# Altium PCB PMP41115.PcbDoc (part 5 of 6)
Units mm, origin at the board's own origin, x right, y up, seen from the top; angles counter-clockwise.
Board outline 102.92 x 46.74 mm, 4 copper layers (Top Layer, Signal Layer 1, Signal Layer 2, Bottom Layer), stack 1.016 mm thick; 174 components, 114 nets, 547 pads, 2622 vias.
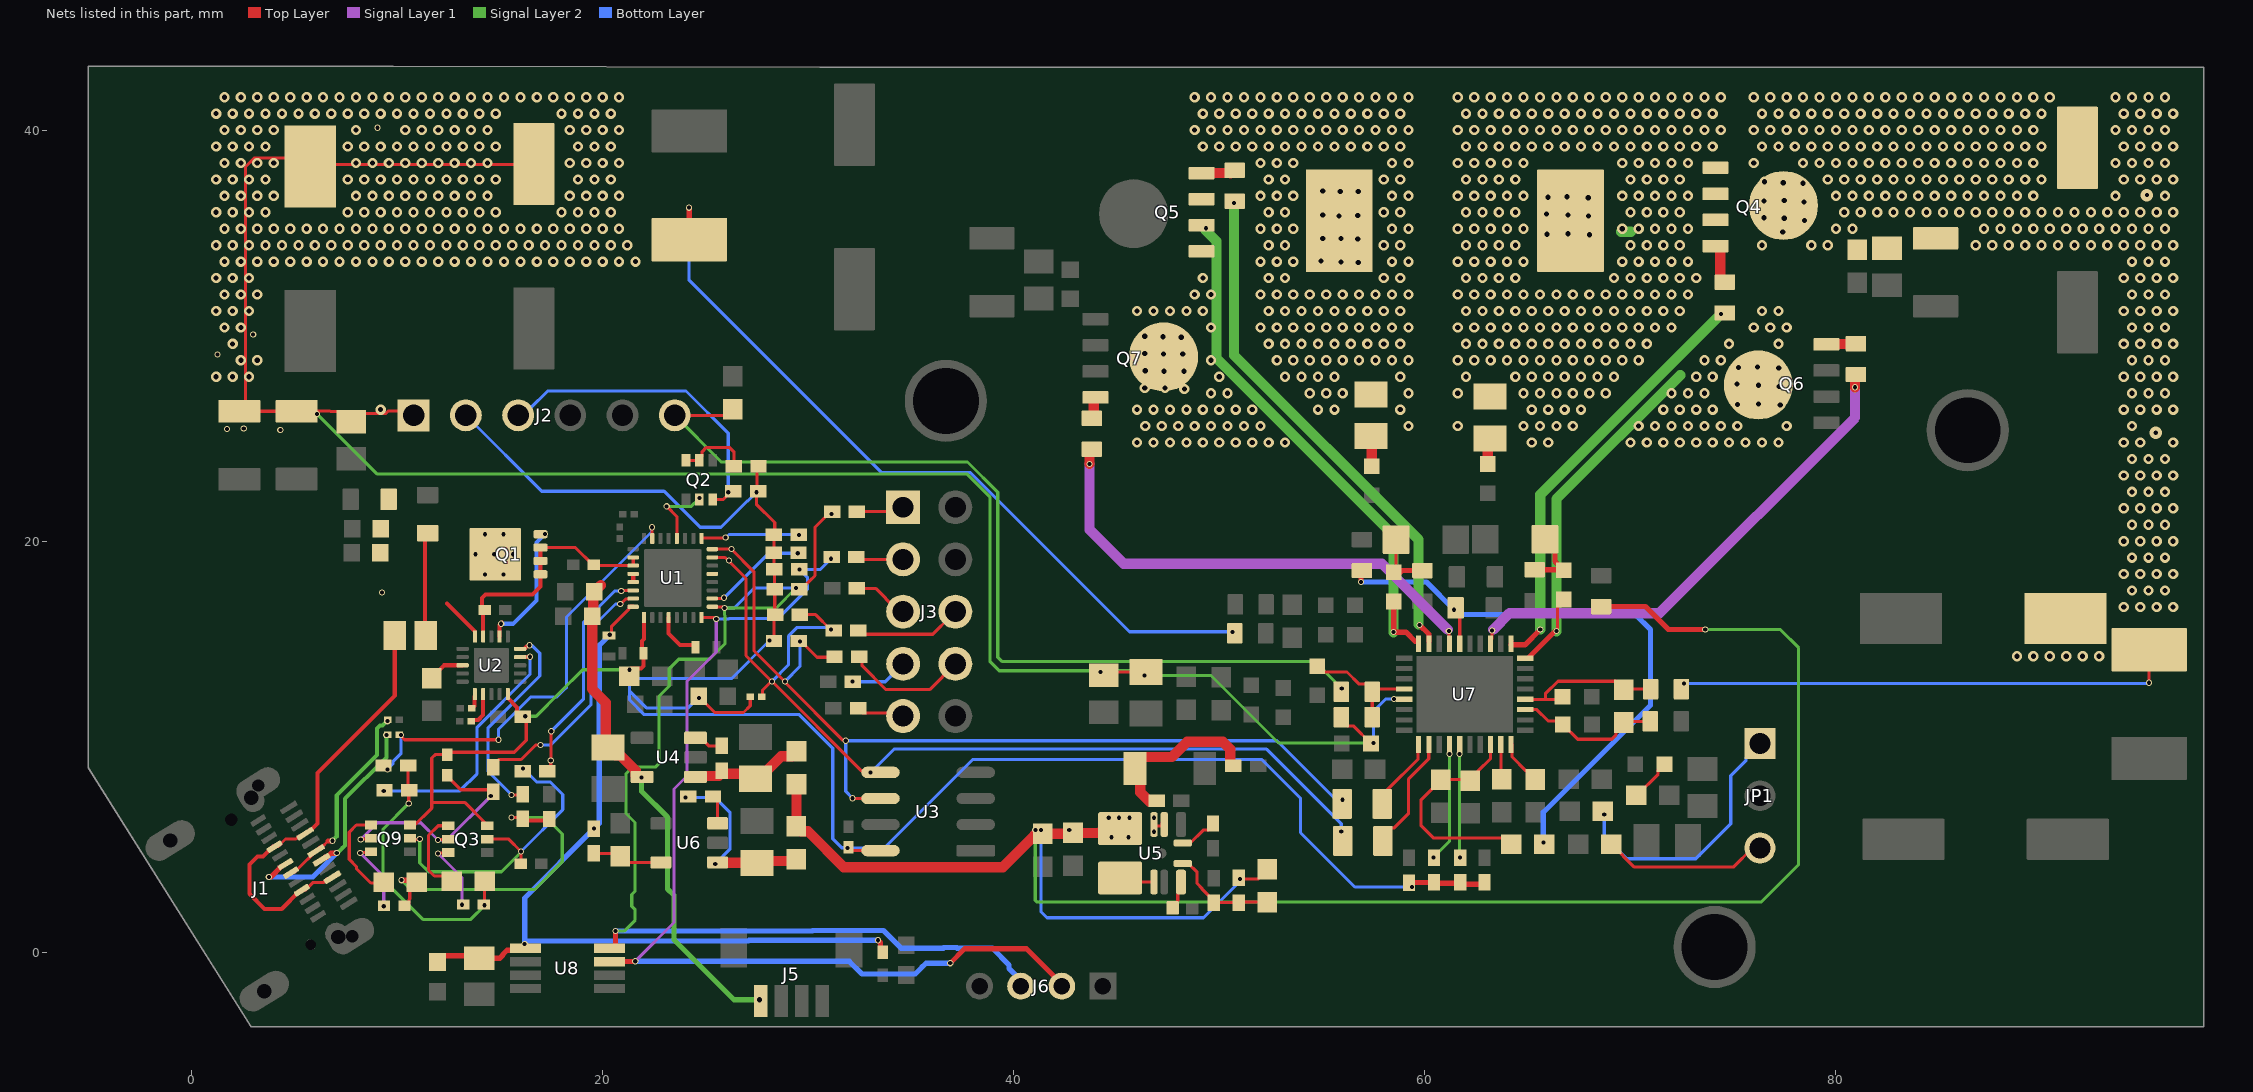
[diagram p5: the nets of this part, all layers, seen from the top]

## Via types
v1: diameter 0.5, hole 0.25, Top Layer to Bottom Layer, 2320 vias
v2: diameter 0.3, hole 0.2, Top Layer to Bottom Layer, tented both sides, 198 vias
v3: diameter 0.5, hole 0.25, Top Layer to Bottom Layer, tented both sides, 61 vias
v4: diameter 0.5, hole 0.2, Top Layer to Bottom Layer, tented both sides, 19 vias
v5: diameter 0.61, hole 0.203, Top Layer to Bottom Layer, tented both sides, 13 vias
v6: diameter 0.5, hole 0.2, Top Layer to Bottom Layer, 6 vias
v7: diameter 0.4, hole 0.2, Top Layer to Bottom Layer, tented both sides, 3 vias
v8: diameter 0.35, hole 0.2, Top Layer to Bottom Layer, tented both sides, 2 vias

## Nets (pads, with @x,y where several pads share a name; then routed paths per layer and width w, separated by ;. In a path a pad name is that pad's centre, name@x,y a point inside that pad or via, vN(x,y) a via of type N, cw(c..) or ccw(c..) an arc to the next point about the centre after c; other vN are vias at no path point) (continued)
GPIO5: R19.1 R100.2 U1.23 | length 21.5
  Top Layer w0.152: v2(10.211,10.592) 10.211,10.534 10.228,10.517 10.382,10.363 v2(14.961,10.363) ; v2(22.428,20.702) 22.432,20.698 22.432,20.16 U1.23@22.435,20.157
  Bottom Layer w0.152: v2(9.551,8.915) 9.821,9.185 9.821,9.288 10.211,9.677 v2(10.211,10.592) ; v2(14.961,10.363) 14.961,10.871 16.535,12.446 17.805,12.446 18.237,12.878 ; 18.263,12.878 18.263,16.332 22.4,20.47 22.4,20.673 v2(22.428,20.702)
GPIO6: R98.1 U1.31 | length 12.3
  Top Layer w0.152: R98.1@14.695,9.029 14.695,9.129 14.968,9.402 16.056,9.402 16.763,10.108 v2(16.993,10.109) v2(16.993,10.109) ; v2(20.879,16.967) 20.909,16.967 21.15,17.208 21.311,17.208 U1.31@21.336,17.232
  Bottom Layer w0.152: v2(16.993,10.109) 17.501,10.109 19.456,12.065 19.456,15.773 20.649,16.966 v2(20.879,16.967) v2(20.879,16.967)
GPIO7: R107.1 U1.30 | length 10.9
  Top Layer w0.152: R107.1@17.332,8.825 17.501,8.994 v2(17.501,9.347) 17.512,9.358 17.512,10.762 v2(17.523,10.773) ; v2(20.93,17.602) 20.944,17.617 21.351,17.617 U1.30@21.361,17.628
  Bottom Layer w0.152: v2(17.523,10.773) 19.101,12.351 19.101,16.078 20.625,17.602 v2(20.93,17.602)
GPIO11: U1.13
GPIO_NF: Q3.5 Q9.5 R107.2 R108.2 | length 15.7
  Top Layer w0.15: Q9.5@10.653,5.563 10.704,5.512 v2@11.049,5.512
  Top Layer w0.152: Q3.5@14.478,5.563 14.513,5.527 15.453,5.527 v2(16.053,4.928) 16.053,4.343 R108.2@16.027,4.318
  Signal Layer 2 w0.152: v2(11.125,5.537) 11.125,4.369 11.557,3.937 15.102,3.937 16.025,4.859 v2@16.025,4.93
  Bottom Layer w0.152: v2@16.027,4.877 16.027,4.902 v2(16.053,4.928) 18.085,6.96 18.085,7.696 17.475,8.306 16.815,8.306 v2(16.154,8.966)
GPIO_PF: Q3.2 Q9.2 R97.1 R98.2 | length 11.6
  Top Layer w0.15: v2(8.255,5.512) 8.28,5.537 8.585,5.537 Q9.2@8.611,5.512 ; v2(12.014,5.486) 12.035,5.507 12.451,5.507 Q3.2@12.471,5.486
  Top Layer w0.152: R97.1@12.459,8.638 12.459,8.588 13.118,7.929 14.595,7.929 14.653,7.871 R98.2@14.695,7.829 14.58,7.714 v2(14.58,7.62)
  Signal Layer 1 w0.15: v2(8.255,5.512) 9.068,6.325 11.176,6.325 v2(12.014,5.486) 12.446,5.486 v2(14.58,7.62)
HIDRV1: R37.2 U7.27 | length 25.2
  Top Layer w0.152: v2(59.766,15.951) v2@59.774,15.951
  Top Layer w0.254: v2(59.766,15.951) 60.223,15.494 U7.27@60.223,15.138
  Signal Layer 2 w0.5: v2(50.739,36.466) 50.739,29.068 59.715,20.091 v2@59.715,15.977
HIDRV2: R34.2 U7.19 | length 21
  Top Layer w0.152: U7.19@64.218,15.136 U7.19@64.267,15.185
  Top Layer w0.254: U7.19@64.22,14.978 64.889,14.978 v2(65.634,15.723)
  Top Layer w0.5: v2(74.422,31.064) 74.481,31.123 R34.2@74.615,31.123
  Signal Layer 2 w0.5: v2(65.634,15.723) 65.634,22.276 v2(74.422,31.064)
I2Cc_SCL: R6.1 R64.2 R109.2 U1.16 U3.6 | length 46.7
  Top Layer w0.152: U1.16@25.36,19.632 25.361,19.633 26.288,19.633 v2(26.289,19.634) 27.381,18.542 27.381,14.707 v2@28.891,13.196 ; v2(28.895,13.2) 28.895,13.16 28.969,13.086 28.969,13.08 31.708,10.341 31.823,10.341 v2(31.852,10.312) ; R6.1@29.561,15.164 29.661,15.164 30.449,14.376 R109.2@31.013,14.376 ; v2(32.182,7.518) 32.188,7.512 32.874,7.512 U3.6@32.893,7.493 ; U3.6@32.87,7.687 33.051,7.506 U3.6@33.541,7.506 ; U3.6@33.985,7.518 U3.6@34.318,7.518
  Bottom Layer w0.152: v2@28.905,13.208 28.905,13.21 29.618,13.923 v2(29.618,15.142) ; v2@32.196,7.544 32.156,7.544 31.852,7.849 v2(31.852,10.312) 52.832,10.312 55.702,7.442 v2(56.007,7.442)
I2Cc_SDA: R7.1 R12.1 R60.2 R63.2 U1.15 U3.5 | length 47.5
  Top Layer w0.152: U1.15@25.476,19.228 25.984,19.228 27,18.212 27,14.453 v2@28.232,13.221 ; R12.1@27.768,12.458 27.793,12.483 27.793,12.757 28.232,13.196 v2@28.219,13.208 ; v2(28.26,13.2) 32.609,8.851 U3.5@33.06,8.851 ; R7.1@29.617,16.45 30.383,16.45 31.111,15.723 v2(31.14,15.723) ; v2(33.06,8.769) U3.5@33.06,8.851 ; U3.5@33.541,8.776 33.466,8.851 U3.5@33.06,8.851
  Bottom Layer w0.152: v2@28.245,13.208 28.268,13.208 29.058,13.998 29.058,15.392 29.491,15.826 30.997,15.826 31.1,15.723 v2(31.14,15.723) ; v2(33.06,8.769) 34.198,9.906 52.324,9.906 55.956,6.274 v2(55.956,5.893)
  other v2: 26.163,19.079
I2Ct_SCL: J6.3 R3.1 R18.1 U1.9 U8.8 | length 55.1
  Top Layer w0.152: U1.9@25.324,16.84 25.345,16.819 25.864,16.819 25.919,16.764 v2(25.959,16.764) ; R3.1@29.591,17.685 29.691,17.685 30.093,18.088 30.353,18.347 30.353,20.701 30.871,21.219 30.871,21.235 31.099,21.463 R18.1@31.115,21.463
  Top Layer w0.254: U8.8@20.358,0.213 20.549,0.213 20.65,0.315 v2(20.65,1.054)
  Signal Layer 2 w0.152: v2(20.65,1.054) 21.069,1.054 21.602,1.586 21.602,2.094 21.438,2.259 21.438,2.833 21.597,2.992 21.597,6.336 21.161,6.772 21.161,8.715 21.488,9.042 22.609,9.042 22.761,9.195 22.761,12.469 23.266,12.974 23.266,13.818 23.724,14.275 25.222,14.275 25.978,15.031 25.978,16.407 25.959,16.427 v2(25.959,16.764) 28.455,16.764 v2(29.432,17.741)
  Bottom Layer w0.152: v2(25.959,16.764) 26.416,16.764 27.393,17.741 v2(29.432,17.741)
  Bottom Layer w0.254: v2(20.65,1.054) 26.949,1.054 26.958,1.064 30.224,1.064 30.247,1.087 33.682,1.087 34.546,0.223 36.589,0.223 36.617,0.251 37.246,0.251 37.274,0.223 38.978,0.223 39.791,-0.591 39.791,-0.771 J6.3@40.437,-1.417
  other v2: 31.155,21.353
I2Ct_SDA: J6.2 R4.1 R20.1 U1.8 U8.7 | length 50.6
  Top Layer w0.152: U1.8@24.835,16.307 25.437,16.307 25.487,16.256 v2@25.552,16.256 ; v2@25.512,16.231 v2(25.552,16.231) ; R20.1@31.048,19.228 R20.1@31.166,19.228
  Top Layer w0.254: U8.7@20.358,-0.437 20.369,-0.426 21.584,-0.426 v2@21.59,-0.432 ; v2(36.932,-0.508) 37.632,0.193 40.64,0.193 42.316,-1.484 J6.2@42.316,-1.651
  Signal Layer 1 w0.152: v2(21.61,-0.415) 23.495,1.47 23.495,7.963 24.13,8.598 24.13,13.208 25.552,14.63 v2(25.552,16.231)
  Bottom Layer w0.152: v2(25.552,16.231) 26.153,16.231 26.175,16.253 28.546,16.253 29.997,17.704 29.997,18.242 v2@29.621,18.618 ; v2(29.592,18.647) 30.608,18.647 31.09,19.128 v2@31.09,19.177
  Bottom Layer w0.254: v2(21.61,-0.415) 32.016,-0.415 32.635,-1.035 35.229,-1.035 35.531,-0.732 35.531,-0.726 35.749,-0.508 v2(36.932,-0.508)
  other v2: 31.13,19.169
I\2\C\c\_\I\R\Q\: R8.1 U1.17 | length 4.8
  Top Layer w0.152: U1.17@24.841,20.218 24.841,20.192 24.859,20.175 25.991,20.175 v2(26.01,20.193)
  Bottom Layer w0.152: v2(26.01,20.193) 26.02,20.193 26.173,20.345 v2@29.549,20.345
  other v2: 29.567,20.323
I\2\C\t\_\I\R\Q\: R5.1 U1.10 | length 5.2
  Top Layer w0.152: U1.10@25.36,17.232 25.853,17.232 25.908,17.287 v2@25.908,17.297
  Bottom Layer w0.152: v2(25.933,17.272) 28.096,19.434 29.493,19.434 v2@29.54,19.482 ; v2(29.516,19.434) 29.544,19.434 v2@29.566,19.456
ICHG: R71.2 U7.9 | length 1.6
  Top Layer w0.152: U7.9@63.754,10.008 63.718,9.972 63.718,8.479 R71.2@63.767,8.43
ILIM_HIZ: R65.2 U7.10 | length 2.3
  Top Layer w0.152: U7.10@64.218,10.178 64.267,10.129 64.267,9.52 64.936,8.851 65.001,8.851 65.405,8.446 R65.2@65.405,8.382
LDO_1V5: C17.2 U1.4 | length 2.4
  Top Layer w0.2: U1.4@23.235,16.307 23.235,15.921 23.223,15.909 23.223,15.536 23.781,14.978 24.452,14.978 24.542,14.887 C17.2@24.542,14.864
LDO_3V3: C10.1 C12.1 C16.2 J2.2 Q3.6 Q9.6 R1.2 R2.2 R3.2 R4.2 R5.2 R6.2 R7.2 R8.2 R12.2 R13.2 R14.2 R67.2 R68.2 R69.2 R70.2 R97.2 U1.1 U2.10 U3.8 | length 120.5
  Top Layer w0.152: Q9.6@10.653,6.213 10.719,6.147 10.82,6.147 11.709,7.036 11.709,7.315 ; Q3.6@14.3,6.325 13.31,7.315 11.709,7.315 ; C10.1@16.307,11.328 16.307,10.338 15.723,9.754 12.575,9.754 R97.2@12.459,9.638 11.873,9.638 11.709,9.474 11.709,7.315 ; v2(24.714,12.395) 24.768,12.395 25.48,11.684 26.873,11.684 27.203,12.014 R12.2@27.203,12.421 ; R2.2@27.505,22.367 27.505,21.82 28.397,20.927 R8.2@28.397,20.345 ; v2(27.508,22.403) 27.54,22.403 R2.2@27.587,22.45 27.529,22.508 27.529,23.59 R1.2@27.605,23.666 ; v2(28.143,15.189) 28.168,15.164 R6.2@28.361,15.164 28.361,16.394 R7.2@28.417,16.45 28.397,16.47 28.397,17.679 R3.2@28.391,17.685 28.379,17.697 R4.2@28.379,18.664 ; R4.2@28.354,18.664 R8.2@28.354,20.334 ; C12.1@31.902,5.055 31.991,4.966 U3.8@33.541,4.966
  Top Layer w0.2: U2.10@15.41,12.584 15.41,12.384 15.413,12.384 15.861,11.935 15.861,11.683 16.089,11.455 C10.1@16.154,11.455 ; v2(21.336,13.767) 21.393,13.823 21.894,13.823 22.011,13.941 C16.2@22.011,14.578 21.935,14.655 21.935,15.158 22.035,15.258 U1.1@22.035,16.307
  Top Layer w0.254: R68.2@59.254,3.415 59.434,3.415 59.443,3.423 R69.2@60.47,3.423 ; R69.2@60.47,3.38 61.701,3.38 R70.2@61.743,3.423 61.835,3.331 62.821,3.331 R67.2@62.921,3.431
  Signal Layer 2 w0.152: v2(16.256,11.506) 16.789,11.506 17.951,12.668 19.05,13.767 v2(21.336,13.767)
  Bottom Layer w0.152: J2.2@13.437,26.035 13.477,26.035 17.058,22.454 23.012,22.454 24.765,20.701 25.781,20.701 27.055,21.975 27.081,21.975 v2(27.508,22.403) ; v2@24.663,12.395 24.663,12.384 24.646,12.367 24.635,12.367 24.181,11.913 22.149,11.913 21.336,12.725 ; v2(28.143,15.189) 26.289,13.335 21.793,13.335 21.361,13.767 v2(21.336,13.767) 21.336,12.725 ; v2@31.902,5.105 31.648,5.105 31.217,5.537 31.217,9.957 29.591,11.582 22.047,11.582 21.336,12.294 21.336,12.725 ; v2(31.943,5.097) 33.723,5.097 38.024,9.398 52.095,9.398 53.975,7.518 53.975,5.842 56.617,3.2 58.09,3.2 ; 58.09,3.192 v2(59.4,3.192)
LODRV1: R43.1 U7.25 | length 24
  Top Layer w0.152: v2(61.189,15.646) 61.203,15.632 61.203,15.124 U7.25@61.214,15.113
  Top Layer w0.254: R43.1@43.788,24.462 R43.1@43.822,24.496
  Top Layer w0.5: v2(43.713,23.774) 43.713,24.384 R43.1@43.79,24.46
  Signal Layer 1 w0.254: v2@61.125,15.71 v2(61.189,15.646)
  Signal Layer 1 w0.5: v2(43.713,23.774) 43.713,20.574 45.364,18.923 57.937,18.923 v2@61.138,15.723
LODRV2: R44.1 U7.21 | length 24.6
  Top Layer w0.152: U7.21@63.218,14.978 63.267,15.027 63.267,15.261 63.297,15.291 v2(63.297,15.672)
  Top Layer w0.5: v2(80.95,27.508) 80.95,28.003 80.988,28.042 R44.1@81.001,28.042
  Signal Layer 1 w0.5: v2@63.348,15.723 64.135,16.51 71.425,16.51 80.95,26.035 v2(80.95,27.508)
NetC6_2: C6.2 R54.2 R56.2 U7.32 | length 5.9
  Top Layer w0.152: C6.2@54.796,13.942 55.083,13.655 56.235,13.655 56.822,13.068 57.162,13.068 57.46,12.769 R56.2@57.46,12.693 ; R56.2@57.429,12.522 57.461,12.491 R54.2@57.461,11.463 ; R56.2@57.506,12.828 U7.32@59.068,12.828
NetC11_2: C11.2 U2.3 | length 1.8
  Top Layer w0.2: C11.2@11.717,13.363 11.717,13.388 12.312,13.984 U2.3@13.21,13.984
NetC19_1: C19.1 R21.2 R22.2 U4.1 | length 5.2
  Top Layer w0.152: U4.1@24.486,8.484 U4.1@24.54,8.484
  Top Layer w0.5: U4.1@24.54,8.553 24.59,8.603 25.666,8.603 25.776,8.712 R22.2@25.832,8.712 ; R22.2@25.875,8.712 C19.1@27.306,8.712 ; C19.1@27.46,8.464 27.626,8.464 28.715,9.553 29.23,9.553 29.286,9.61 R21.2@29.286,9.677
NetC21_1: C21.1 C22.1 R23.1 U5.2 U5.3 | length 9.6
  Top Layer w0.152: U5.3@46.845,6.239 46.919,6.165 47.272,6.165 U5.2@47.345,6.239
  Top Layer w0.254: U5.3@46.845,6.239 v8(46.845,6.569) ; C22.1@46.97,7.402 47.07,7.402 C22.1@47.243,7.229 ; U5.2@47.297,6.287 U5.2@47.345,6.239
  Top Layer w0.5: C22.1@46.641,7.348 46.175,7.813 46.175,8.712 C21.1@45.919,8.968 45.919,9.218 46.219,9.518 47.713,9.518 48.456,10.262 50.19,10.262 50.557,9.895 50.557,9.142 50.607,9.092 R23.1@50.707,9.092
  other v8: 46.845,5.889
NetC23_1: C23.1 U5.8 | length 1.4
  Top Layer w0.152: C23.1@47.748,2.184 47.976,2.412 47.976,2.499 48.004,2.527 48.004,2.826 48.011,2.832 48.011,3.292 U5.8@48.157,3.439
NetC24_2: C24.2 R24.1 R29.2 U5.9 | length 5.1
  Top Layer w0.152: U5.9@48.245,4.339 48.52,4.339 48.946,3.913 48.946,3.366 49.176,3.135 49.176,3.109 49.239,3.046 49.239,3.037 R29.2@49.752,2.523 ; R29.2@49.835,2.489 49.881,2.443 C24.2@50.965,2.443 ; C24.2@51.003,2.464 52.348,2.464 R24.1@52.352,2.46
NetC27_1: C27.1 R26.2 U6.5 | length 3.3
  Top Layer w0.152: R26.2@19.594,4.833 20.784,4.833 C27.1@20.803,4.851 ; C27.1@20.904,4.597 21.108,4.394 U6.5@22.862,4.394
NetC28_1: C28.1 R25.2 R27.2 U6.1 | length 9.2
  Top Layer w0.152: v2(25.502,4.318) 25.577,4.394 U6.1@25.612,4.394 ; R25.2@29.337,4.496 29.391,4.496 R25.2@29.452,4.557
  Top Layer w0.5: U6.1@25.612,4.394 25.621,4.384 C28.1@27.391,4.384 ; C28.1@27.531,4.375 27.622,4.466 29.24,4.466 R25.2@29.337,4.369
  Bottom Layer w0.152: v2(24.054,7.544) 25.502,7.544 26.213,6.833 26.213,5.029 v2(25.502,4.318)
NetC36_1: C36.1 R41.1 | length 1.4
  Top Layer w0.5: C36.1@57.379,23.774 57.412,23.774 57.442,23.804 57.442,25.099 R41.1@57.406,25.134
NetC37_1: C37.1 R42.1 | length 1.3
  Top Layer w0.5: C37.1@63.077,23.779 63.077,24.899 R42.1@63.198,25.02
NetC40_2: C40.2 D3.1 R49.2 | length 3.1
  Top Layer w0.152: C40.2@58.507,18.513 58.622,18.628 D3.1@58.622,20.096
  Top Layer w0.254: C40.2@58.507,18.513 58.533,18.487 58.812,18.487 58.915,18.59 R49.2@59.903,18.59
NetC41_1: C41.1 D4.1 R50.2 | length 3.1
  Top Layer w0.254: R50.2@65.362,18.635 C41.1@66.641,18.635 ; D4.1@65.862,20.114 66.349,19.627 66.349,19.033 66.726,18.657 C41.1@66.726,18.644
NetC42_1: C42.1 R51.1 | length 2
  Top Layer w0.152: R51.1@70.315,7.656 70.34,7.656 71.373,8.688 71.373,8.889 C42.1@71.577,9.093
NetJ3_1: J3.1 R18.2 | length 2
  Top Layer w0.152: R18.2@32.395,21.459 34.362,21.459 J3.1@34.417,21.514
NetJ3_3: J3.3 R20.2 | length 2.1
  Top Layer w0.152: R20.2@32.369,19.249 32.485,19.134 34.399,19.134 J3.3@34.417,19.152
NetJ3_5: J3.5 R48.2 | length 2.3
  Top Layer w0.152: R48.2@32.395,17.725 33.304,17.725 J3.5@34.29,16.739
NetJ3_6: J3.6 R60.1 | length 4.9
  Top Layer w0.152: R60.1@32.458,15.676 32.641,15.493 36.08,15.493 36.945,16.358 J3.6@36.957,16.358
NetJ3_7: J3.7 R66.2 | length 2.5
  Bottom Layer w0.152: v2(32.183,13.186) 33.774,13.186 34.366,13.778 J3.7@34.366,13.843
NetJ3_8: J3.8 R109.1 | length 6
  Top Layer w0.152: R109.1@32.502,14.402 32.647,14.258 32.647,13.962 33.807,12.802 35.929,12.802 J3.8@37.182,14.054
NetJ3_9: J3.9 R110.2 | length 2.2
  Top Layer w0.152: R110.2@32.452,11.887 32.675,11.663 34.565,11.663 J3.9@34.595,11.633
NetJP1_1: JP1.1 R58.2 | length 12.7
  Bottom Layer w0.152: JP1.1@76.29,10.211 JP1.1@76.325,10.175
  Bottom Layer w0.154: v2(68.747,6.723) 68.747,5.675 69.85,4.572 73.203,4.572 74.905,6.274 74.905,8.611 75.652,9.358 75.652,9.502 76.081,9.931 JP1.1@76.225,9.931
NetJP1_3: JP1.3 R59.2 | length 8.1
  Top Layer w0.152: R59.2@69.082,5.272 69.107,5.272 70.213,4.166 75.031,4.166 75.961,5.095 JP1.3@76.325,5.095
NetQ1_4: Q1.4 U2.17 | length 6.3
  Top Layer w0.2: U2.17@15.01,15.384 15.01,15.936 v2@15.127,16.053
  Bottom Layer w0.2: v2(15.088,16.002) 15.672,16.002 16.815,17.145 16.815,19.964 v2(17.221,20.371)
NetQ2_2: Q2.2 U1.20 | length 3.5
  Top Layer w0.152: v2(23.139,21.717) 23.635,21.221 U1.20@23.635,20.157 ; Q2.2@24.663,22.123 Q2.2@24.689,22.098
  Signal Layer 2 w0.152: v2(23.139,21.717) 24.333,21.717 24.691,22.075 24.691,22.095 v2@24.689,22.098
  other v2: 24.74,22.123
NetQ2_5: Q2.5 Q2.6 R1.1 | length 3.3
  Top Layer w0.152: Q2.6@24.079,23.952 24.537,23.952 Q2.5@24.562,23.927 ; Q2.5@24.74,24.13 24.817,24.13 24.863,24.176 24.863,24.38 25.07,24.587 26.187,24.587 26.405,24.37 R1.1@26.405,23.666
NetQ3_1: Q3.1 R102.2 | length 3.8
  Top Layer w0.152: R102.2@12.344,3.683 12.297,3.73 11.84,3.73 11.551,4.019 11.551,5.709 12.019,6.177 Q3.1@12.517,6.177
NetQ3_3: Q3.3 R106.1 | length 3.3
  Top Layer w0.152: v2(12.014,4.826) 12.04,4.852 12.294,4.852 Q3.3@12.294,4.801
  Signal Layer 1 w0.152: v2(12.014,4.826) 13.183,3.658 v2(13.183,2.337)
NetQ4_4: Q4.4 R34.1 | length 2.1
  Top Layer w0.5: Q4.4@74.158,34.378 74.332,34.378 74.387,34.323 74.387,32.748 74.512,32.623 R34.1@74.615,32.623
NetQ5_4: Q5.4 R37.1 | length 1.6
  Top Layer w0.152: R37.1@50.571,37.961 50.711,37.961 R37.1@50.775,38.024
  Top Layer w0.5: Q5.4@49.164,37.929 50.565,37.929 R37.1@50.571,37.922
NetQ6_4: Q6.4 R44.2 | length 1.4
  Top Layer w0.5: Q6.4@79.555,29.596 79.572,29.612 80.869,29.612 R44.2@80.899,29.642
NetQ7_4: Q7.4 R43.2 | length 1.1
  Top Layer w0.5: R43.2@43.822,25.996 43.91,26.084 43.91,26.958 43.965,27.013 Q7.4@43.998,27.013
NetQ9_1: Q9.1 R101.2 | length 4.8
  Top Layer w0.152: Q9.1@8.753,6.213 8.041,6.213 7.696,5.867 7.696,4.541 8.043,4.194 8.043,4.098 8.746,3.395 9.229,3.395 9.271,3.353 R101.2@9.347,3.429
NetQ9_3: Q9.3 R105.1 | length 3.5
  Top Layer w0.152: v2(8.23,4.851) 8.258,4.88 8.588,4.88 Q9.3@8.611,4.902
  Signal Layer 1 w0.152: v2(8.23,4.851) 9.373,3.708 v2(9.373,2.261) 9.373,2.235 v2@9.347,2.21
NetR10_1: R10.1 U2.7 | length 1.7
  Top Layer w0.2: R10.1@13.624,11.271 13.684,11.331 13.973,11.331 14.21,11.568 U2.7@14.21,12.584
NetR11_1: R11.1 U2.6 | length 0.6
  Top Layer w0.2: R11.1@13.663,11.887 13.683,11.887 13.792,11.996 U2.6@13.792,12.471
NetR22_1: R22.1 U4.3 | length 1.4
  Top Layer w0.152: U4.3@24.54,10.453 24.79,10.453 25.181,10.062 R22.1@25.825,10.062
NetR27_1: R27.1 U6.3 | length 1.4
  Top Layer w0.152: R27.1@25.391,7.6 25.612,7.38 25.612,6.358 U6.3@25.552,6.299
NetR28_2: R28.2 U5.11 | length 2
  Top Layer w0.152: U5.11@48.245,5.339 48.269,5.315 48.589,5.315 49.237,5.963 49.49,5.963 49.657,6.13 R28.2@49.657,6.35
NetR63_1: R63.1 U7.2 | length 5.6
  Top Layer w0.152: R63.1@57.984,5.44 57.984,5.665 58.383,6.063 58.514,6.063 59.233,6.782 59.233,8.46 60.213,9.44 60.213,9.954 60.218,9.959 U7.2@60.218,10.003
NetR64_1: R64.1 U7.1 | length 3.7
  Top Layer w0.152: R64.1@57.955,7.242 58.201,7.488 58.201,7.926 59.69,9.415 U7.1@59.69,10.236
NetR99_2: R99.2 R101.1 R103.2 R105.2 | length 16.2
  Top Layer w0.152: R105.2@10.386,2.285 10.436,2.285 10.609,2.459 10.609,2.583 10.643,2.616 R101.1@10.643,3.251 ; v2(15.596,6.579) 16.027,6.579 R103.2@16.053,6.553
  Top Layer w0.2: R103.2@16.133,6.517 16.219,6.431 17.357,6.431 R99.2@17.433,6.507
  Top Layer w0.254: v2(10.235,3.531) 10.617,3.531 R101.1@10.744,3.404
  Signal Layer 2 w0.152: v2(10.235,3.531) 10.693,3.073 16.713,3.073 18.059,4.42 18.059,5.778 17.259,6.579 15.664,6.579 15.621,6.621 v2@15.621,6.629
NetR100_1: R100.1 R102.1 R104.1 R106.2 | length 13.3
  Top Layer w0.152: R104.1@10.289,7.679 10.513,7.903 R104.1@10.613,7.903 ; R104.1@10.465,7.976 10.562,8.073 R100.1@10.562,9.107 ; v2(10.592,7.264) R104.1@10.592,7.722 ; R106.2@14.249,2.438 14.283,2.472 R102.1@14.283,3.48
  Signal Layer 2 w0.152: v2(10.592,7.264) 9.347,6.02 9.347,3.556 11.278,1.626 13.614,1.626 v2@14.274,2.286
  other v2: 14.275,2.311
NetU5_5: U5.5 U5.6 | length 1.7
  Top Layer w0.152: U5.5@45.195,3.639 45.393,3.441 46.843,3.441 U5.6@46.845,3.439
P_OUT: C51.2 C52.2 C53.1 C54.1 C62.1 Q4.5-6-7-8 R33.1 R35.1 | length 23.4
  Top Layer w0.152: v2(95.25,13.132) R33.1@95.25,13.894
  Bottom Layer w0.152: v2@72.644,13.106 95.225,13.106 v2(95.25,13.132)
  other v1: 88.823,14.421 89.623,14.421 90.423,14.421 91.223,14.421 92.023,14.421 92.823,14.421 94.023,16.821 94.823,16.821 95.623,16.821 96.423,16.821 94.423,17.621 95.223,17.621 96.023,17.621 94.023,18.421 94.823,18.421 95.623,18.421 96.423,18.421 94.423,19.221 95.223,19.221 96.023,19.221 94.023,20.021 94.823,20.021 95.623,20.021 96.423,20.021 94.423,20.821 95.223,20.821 96.023,20.821 94.023,21.621 94.823,21.621 95.623,21.621 96.423,21.621 94.423,22.421 95.223,22.421 96.023,22.421 94.023,23.221 94.823,23.221 95.623,23.221 96.423,23.221 94.423,24.021 95.223,24.021 96.023,24.021 94.023,24.821 94.823,24.821 96.423,24.821 94.423,25.621 94.023,26.421 94.823,26.421 95.623,26.421 96.423,26.421 94.423,27.221 95.223,27.221 96.023,27.221 94.023,28.021 94.823,28.021 95.623,28.021 96.423,28.021 94.423,28.821 95.223,28.821 96.023,28.821 94.023,29.621 94.823,29.621 95.623,29.621 96.423,29.621 94.423,30.421 95.223,30.421 96.023,30.421 94.023,31.221 94.823,31.221 95.623,31.221 96.423,31.221 94.423,32.021 95.223,32.021 96.023,32.021 94.023,32.821 94.823,32.821 95.623,32.821 96.423,32.821 94.423,33.621 95.223,33.621 96.023,33.621 76.423,34.421 78.823,34.421 79.623,34.421 86.823,34.421 87.623,34.421 88.423,34.421 89.223,34.421 90.023,34.421 90.823,34.421 91.623,34.421 92.423,34.421 93.223,34.421 94.023,34.421 94.823,34.421 95.623,34.421 96.423,34.421 80.023,35.221 80.823,35.221 87.223,35.221 88.023,35.221 88.823,35.221 89.623,35.221 90.423,35.221 91.223,35.221 92.023,35.221 92.823,35.221 93.623,35.221 94.423,35.221 95.223,35.221 96.023,35.221 80.423,36.021 81.223,36.021 82.023,36.021 82.823,36.021 83.623,36.021 84.423,36.021 85.223,36.021 86.023,36.021 86.823,36.021 87.623,36.021 88.423,36.021 89.223,36.021 90.023,36.021 90.823,36.021 91.623,36.021 92.423,36.021 93.223,36.021 94.023,36.021 94.823,36.021 95.623,36.021 96.423,36.021 80.023,36.821 80.823,36.821 81.623,36.821 82.423,36.821 83.223,36.821 84.023,36.821 84.823,36.821 85.623,36.821 86.423,36.821 87.223,36.821 88.023,36.821 88.823,36.821 89.623,36.821 93.623,36.821 96.023,36.821 79.623,37.621 80.423,37.621 81.223,37.621 82.023,37.621 82.823,37.621 83.623,37.621 84.423,37.621 85.223,37.621 86.023,37.621 86.823,37.621 87.623,37.621 88.423,37.621 89.223,37.621 90.023,37.621 94.023,37.621 94.823,37.621 95.623,37.621 96.423,37.621 76.023,38.421 78.423,38.421 79.223,38.421 80.023,38.421 80.823,38.421 81.623,38.421 82.423,38.421 83.223,38.421 84.023,38.421 84.823,38.421 85.623,38.421 86.423,38.421 87.223,38.421 88.023,38.421 88.823,38.421 89.623,38.421 93.623,38.421 94.423,38.421 95.223,38.421 96.023,38.421 76.423,39.221 77.223,39.221 78.023,39.221 78.823,39.221 79.623,39.221 80.423,39.221 81.223,39.221 82.023,39.221 82.823,39.221 83.623,39.221 84.423,39.221 85.223,39.221 86.023,39.221 86.823,39.221 87.623,39.221 88.423,39.221 89.223,39.221 90.023,39.221 94.023,39.221 94.823,39.221 95.623,39.221 96.423,39.221 76.023,40.021 76.823,40.021 77.623,40.021 78.423,40.021 79.223,40.021 80.023,40.021 80.823,40.021 81.623,40.021 82.423,40.021 83.223,40.021 84.023,40.021 84.823,40.021 85.623,40.021 86.423,40.021 87.223,40.021 88.023,40.021 88.823,40.021 89.623,40.021 93.623,40.021 94.423,40.021 95.223,40.021 96.023,40.021 76.423,40.821 77.223,40.821 78.023,40.821 78.823,40.821 79.623,40.821 80.423,40.821 81.223,40.821 82.023,40.821 82.823,40.821 83.623,40.821 84.423,40.821 85.223,40.821 86.023,40.821 86.823,40.821 87.623,40.821 88.423,40.821 89.223,40.821 90.023,40.821 94.023,40.821 94.823,40.821 95.623,40.821 96.423,40.821 76.023,41.621 76.823,41.621 77.623,41.621 78.423,41.621 79.223,41.621 80.023,41.621 80.823,41.621 81.623,41.621 82.423,41.621 83.223,41.621 84.023,41.621 84.823,41.621 85.623,41.621 86.423,41.621 87.223,41.621 88.023,41.621 88.823,41.621 89.623,41.621 90.423,41.621 93.623,41.621 94.423,41.621 95.223,41.621 96.023,41.621
  other v2: 72.634,13.098
  other v3: 77.432,35.071 78.499,35.63 77.508,35.731 76.518,35.757 78.473,36.519 76.518,36.57 77.508,36.595 78.423,37.433 77.457,37.459 76.543,37.509
  other v5: 95.58,25.298 95.148,36.855
PD_D_N: J1.A7 J1.B7 R19.2 | length 12
  Top Layer w0.254: v2(3.785,3.683) 3.793,3.692 3.889,3.692 4.388,4.191 J1.B7@4.42,4.191 ; J1.A7@6.528,4.648 6.608,4.648 6.802,4.843 7.078,4.843 v2(7.087,4.851)
  Signal Layer 2 w0.2: v2(7.087,4.851) 7.114,4.851 7.344,5.081 7.352,5.081 7.493,5.223 7.493,7.493 9.5,9.5 v2(9.5,10.592)
  Bottom Layer w0.254: v2(3.785,3.683) 5.918,3.683 v2(7.087,4.851)
PD_D_P: J1.A6 J1.B6 R17.2 | length 9.6
  Top Layer w0.152: J1.B6@4.902,3.912 5.03,3.912 6.253,5.135 6.358,5.135 6.662,5.438
  Top Layer w0.254: 6.662,5.438 6.873,5.438 v2(6.882,5.447)
  Signal Layer 2 w0.2: v2(6.882,5.447) 7.087,5.652 7.087,7.652 9.05,9.615 9.05,10.905 9.191,11.047 9.319,11.047 9.537,11.264 v2(9.564,11.264)
PP5V: C13.1 C14.1 C20.1 J5.1 U1.28 U1.29 U4.5 | length 25.3
  Top Layer w0.2: U1.28@21.488,18.415 21.51,18.393 U1.29@21.51,18.032
  Top Layer w0.5: C14.1@19.939,17.882 19.786,17.729 19.761,17.729 19.611,17.579 C14.1@19.611,17.554 19.564,17.506 19.564,16.427 C13.1@19.516,16.379 19.516,16.206 19.519,16.204 19.519,12.828 20.176,12.17 C20.1@20.176,10.091 ; C20.1@20.278,9.99 C20.1@20.176,10.091 ; U4.5@21.94,8.553 21.69,8.553 21.64,8.603 21.64,8.853 20.888,9.605 20.663,9.605 C20.1@20.176,10.091
  Signal Layer 2 w0.254: v7(21.92,8.534) 21.92,7.859 23.181,6.599 23.181,3.108 23.495,2.794 23.495,0.635 26.416,-2.286 v1(27.661,-2.286)
PP7V: C24.1 C25.1 C26.1 R21.1 R24.2 R25.1 R55.1 U5.4 | length 98.3
  Top Layer w0.152: U5.4@44.298,5.929 45.085,5.929 U5.4@45.195,6.039 ; v2(51.029,3.581) 51.899,3.581 52.222,3.905 R24.2@52.222,4.064
  Top Layer w0.254: 40.945,5.79 40.945,5.83 41.072,5.957 v2(41.072,5.969) ; R55.1@68.595,16.841 70.749,16.841 71.867,15.723 v2(73.66,15.723)
  Top Layer w0.5: R25.1@29.453,6.291 29.453,8.202 R21.1@29.455,8.203 ; R25.1@29.479,6.291 29.479,6.105 29.677,5.907 30.015,5.907 31.757,4.166 39.497,4.166 40.945,5.613 41.247,5.613 C25.1@41.423,5.79 ; v2(41.351,5.969) 41.351,5.862 C25.1@41.423,5.79 ; C26.1@42.723,5.79 C25.1@41.423,5.79 ; C26.1@42.906,5.827 44.196,5.827 U5.4@44.298,5.929
  Signal Layer 2 w0.152: v2(41.072,5.969) 41.072,2.553 41.165,2.46 48.989,2.46 48.993,2.464 76.378,2.464 78.207,4.293 78.207,14.834 77.318,15.723 v2(73.66,15.723)
  Bottom Layer w0.152: v2(41.072,5.969) v2@41.326,5.969 ; v2(41.351,5.969) 41.351,1.993 41.643,1.702 49.251,1.702 v2@51.079,3.531
  other v2: 42.723,5.969
  other v4: 44.785,5.619 45.605,5.619 44.645,6.569 45.145,6.569 45.645,6.569
PP_EN: J2.3 Q2.3 R2.1 | length 15.2
  Top Layer w0.152: Q2.3@25.379,22.052 25.889,22.052 26.24,22.403 R2.1@26.264,22.403
  Bottom Layer w0.152: J2.3@16.027,26.467 16.485,26.467 17.348,27.33 24.079,27.33 26.137,25.273 v2(26.137,22.403)
PPHV: C31.2 C44.2 C45.1 C55.2 C56.1 C57.1 C59.1 J2.1 R30.1 R31.2 R45.2 R54.1 U7.33 | length 144.7
  Top Layer w0.152: C31.2@2.349,26.339 C31.2@2.654,26.339 ; J2.1@10.831,26.141 10.626,26.346 9.582,26.346 9.47,26.234 9.223,26.234 8.193,26.234 C59.1@7.79,25.831 7.291,26.33 6.776,26.33 6.76,26.346 C56.1@5.138,26.346 5.135,26.342 2.658,26.342 C31.2@2.654,26.339 ; C55.2@16.675,38.365 16.65,38.339 14.423,38.339 13.623,38.339 12.823,38.339 12.023,38.339 11.223,38.339 10.423,38.339 9.623,38.339 8.823,38.339 8.023,38.339 5.888,38.339 C57.1@5.796,38.248 5.385,38.659 3.073,38.659 2.647,38.232 2.647,37.621 2.647,37.3 2.654,37.293 2.654,36.021 2.654,34.421 2.654,32.821 2.654,31.221 C31.2@2.654,26.339 ; v2(44.247,13.665) C45.1@44.406,13.506 44.565,13.665 46.252,13.665 R45.2@46.379,13.538 ; v2(46.38,13.487) R45.2@46.649,13.756 ; R54.1@55.663,11.887 55.73,11.82 55.73,11.57 R54.1@55.768,11.532 ; R54.1@55.905,11.532 R54.1@55.893,11.532 ; R54.1@55.962,11.463 R54.1@55.893,11.532 ; C44.2@57.4,10.182 56.542,11.039 56.26,11.039 R54.1@55.768,11.532 ; v2(58.522,12.344) 58.53,12.336 59.06,12.336 U7.33@59.068,12.328 ; R54.1@55.768,11.532 R54.1@55.893,11.532
  Top Layer w0.254: R30.1@24.155,35.509 24.232,35.585 v2(24.232,36.246)
  Signal Layer 2 w0.152: v2(6.121,26.213) 9.039,23.295 37.741,23.295 38.862,22.174 38.862,14.173 39.319,13.716 46.152,13.716 v2(46.38,13.487) 49.618,13.487 52.903,10.203 v2(57.521,10.203)
  Bottom Layer w0.152: v2(24.232,36.246) 24.232,32.715 28.169,28.778 33.579,23.368 37.897,23.368 45.652,15.613 v2(50.663,15.613) ; v2(57.521,10.203) 57.521,11.75 58.115,12.344 v2(58.522,12.344)
  other v1: 9.223,26.421 1.223,28.021 2.023,28.021 2.823,28.021 2.423,28.821 3.223,28.821 2.023,29.621 1.623,30.421 2.423,30.421 1.223,31.221 2.023,31.221 2.823,31.221 1.623,32.021 2.423,32.021 3.223,32.021 1.223,32.821 2.023,32.821 2.823,32.821 1.623,33.621 2.423,33.621 3.223,33.621 4.023,33.621 4.823,33.621 5.623,33.621 6.423,33.621 7.223,33.621 8.023,33.621 8.823,33.621 9.623,33.621 10.423,33.621 11.223,33.621 12.023,33.621 12.823,33.621 13.623,33.621 14.423,33.621 15.223,33.621 16.023,33.621 16.823,33.621 17.623,33.621 18.423,33.621 19.223,33.621 20.023,33.621 20.823,33.621 21.623,33.621 1.223,34.421 2.023,34.421 2.823,34.421 3.623,34.421 4.423,34.421 5.223,34.421 6.023,34.421 6.823,34.421 7.623,34.421 8.423,34.421 9.223,34.421 10.023,34.421 10.823,34.421 11.623,34.421 12.423,34.421 13.223,34.421 14.023,34.421 14.823,34.421 15.623,34.421 16.423,34.421 17.223,34.421 18.023,34.421 18.823,34.421 19.623,34.421 20.423,34.421 21.223,34.421 1.623,35.221 2.423,35.221 3.223,35.221 4.023,35.221 4.823,35.221 5.623,35.221 6.423,35.221 7.223,35.221 8.023,35.221 8.823,35.221 9.623,35.221 10.423,35.221 11.223,35.221 12.023,35.221 12.823,35.221 13.623,35.221 14.423,35.221 15.223,35.221 16.023,35.221 16.823,35.221 17.623,35.221 18.423,35.221 19.223,35.221 20.023,35.221 20.823,35.221 1.223,36.021 2.023,36.021 2.823,36.021 3.623,36.021 7.623,36.021 8.423,36.021 9.223,36.021 10.023,36.021 10.823,36.021 11.623,36.021 12.423,36.021 13.223,36.021 14.023,36.021 14.823,36.021 18.023,36.021 18.823,36.021 19.623,36.021 20.423,36.021 1.623,36.821 2.423,36.821 3.223,36.821 4.023,36.821 8.023,36.821 8.823,36.821 9.623,36.821 10.423,36.821 11.223,36.821 12.023,36.821 12.823,36.821 13.623,36.821 14.423,36.821 18.423,36.821 19.223,36.821 20.023,36.821 20.823,36.821 1.223,37.621 2.023,37.621 2.823,37.621 3.623,37.621 7.623,37.621 8.423,37.621 9.223,37.621 10.023,37.621 10.823,37.621 11.623,37.621 12.423,37.621 13.223,37.621 14.023,37.621 14.823,37.621 18.823,37.621 19.623,37.621 20.423,37.621 1.623,38.421 2.423,38.421 3.223,38.421 4.023,38.421 8.023,38.421 8.823,38.421 9.623,38.421 10.423,38.421 11.223,38.421 12.023,38.421 12.823,38.421 13.623,38.421 14.423,38.421 18.423,38.421 19.223,38.421 20.023,38.421 20.823,38.421 1.223,39.221 2.023,39.221 2.823,39.221 3.623,39.221 7.623,39.221 8.423,39.221 9.223,39.221 10.023,39.221 10.823,39.221 11.623,39.221 12.423,39.221 13.223,39.221 14.023,39.221 14.823,39.221 18.823,39.221 19.623,39.221 20.423,39.221 1.623,40.021 2.423,40.021 3.223,40.021 4.023,40.021 8.023,40.021 10.423,40.021 11.223,40.021 12.023,40.021 12.823,40.021 13.623,40.021 14.423,40.021 18.423,40.021 19.223,40.021 20.023,40.021 20.823,40.021 1.223,40.821 2.023,40.821 2.823,40.821 3.623,40.821 4.423,40.821 5.223,40.821 6.023,40.821 6.823,40.821 7.623,40.821 8.423,40.821 9.223,40.821 10.023,40.821 10.823,40.821 11.623,40.821 12.423,40.821 13.223,40.821 14.023,40.821 14.823,40.821 18.023,40.821 18.823,40.821 19.623,40.821 20.423,40.821 1.623,41.621 2.423,41.621 3.223,41.621 4.023,41.621 4.823,41.621 5.623,41.621 6.423,41.621 7.223,41.621 8.023,41.621 8.823,41.621 9.623,41.621 10.423,41.621 11.223,41.621 12.023,41.621 12.823,41.621 13.623,41.621 14.423,41.621 15.223,41.621 16.023,41.621 16.823,41.621 17.623,41.621 18.423,41.621 19.223,41.621 20.023,41.621 20.823,41.621
  other v2: 4.343,25.425 1.753,25.476 2.565,25.502 1.295,29.108 3.023,30.074 9.068,40.132
REGN: C46.1 R38.2 R53.1 U7.24 | length 30
  Top Layer w0.152: v2(61.443,16.688) 61.517,16.762 C46.1@61.517,16.776 61.718,16.574 61.718,15.015 U7.24@61.722,15.011
  Top Layer w0.254: v2(56.921,18.034) 56.921,18.415 R53.1@56.972,18.466
  Bottom Layer w0.254: v2(56.921,18.034) 60.096,18.034 v2(61.443,16.688) 61.671,16.459 70.256,16.459 70.993,15.723 70.993,12.04 65.786,6.833 v2(65.786,5.359) v2@65.799,5.347
SBU1: R103.1 U2.15 | length 10
  Top Layer w0.152: v2(15.596,7.671) 15.951,7.671 R103.1@15.977,7.696
  Top Layer w0.2: U2.15@16.01,14.784 16.21,14.784 16.317,14.891 16.362,14.891 16.432,14.961 v2(16.459,14.961)
  Bottom Layer w0.152: v2(15.596,7.671) 14.453,8.814 14.453,10.947 16.967,13.462 16.967,14.573 16.608,14.932 16.487,14.932 v2(16.459,14.961)
SBU2: R104.2 U2.14 | length 12.1
  Top Layer w0.2: U2.14@16.01,14.384 16.466,14.384 v2(16.485,14.402)
  Bottom Layer w0.152: v2(9.373,7.874) 13.081,7.874 13.919,8.712 13.919,10.973 16.485,13.538 v2(16.485,14.402)
SRN: C30.2 C35.1 R36.2 U7.13 | length 6.9
  Top Layer w0.152: U7.13@64.868,11.828 65.464,11.828 66.015,11.278 C35.1@66.751,11.278 ; C35.1@66.734,11.106 67.452,10.389 69.12,10.389 69.316,10.585 69.316,10.776 69.538,10.998 C30.2@69.748,10.998 ; C30.2@69.694,11.2 69.752,11.258 70.758,11.258 R36.2@70.79,11.227
SRP: C30.1 C34.1 R35.2 U7.14 | length 7.2
  Top Layer w0.152: U7.14@64.868,12.328 65.888,12.328 ; C34.1@66.715,12.454 66.589,12.328 65.888,12.328 ; C30.1@69.494,13.03 69.317,13.208 66.497,13.208 65.888,12.598 65.888,12.328 ; C30.1@69.926,12.852 69.956,12.823 R35.2@71.003,12.823
STAT1: R69.1 U7.4 | length 5.9
  Top Layer w0.152: v2@61.216,9.677 61.216,10.176 U7.4@61.218,10.178
  Signal Layer 2 w0.152: v2(60.442,4.64) 61.214,5.412 v2(61.214,9.677)
STAT2: R70.1 U7.5 | length 5.5
  Top Layer w0.152: v2@61.697,9.703 61.716,9.722 61.716,10.176 U7.5@61.718,10.178
  Signal Layer 2 w0.152: v2(61.714,9.677) 61.714,7.25 61.709,7.244 61.709,4.668 v2(61.737,4.64)
SW1: C40.1 L2.1 Q5.1 Q5.2 Q5.3 Q7.5-6-7-8 R41.2 U7.28 | length 26.5
  Top Layer w0.254: v2(58.496,15.596) 59.101,15.596 59.545,15.151 59.716,15.151 59.718,15.149 U7.28@59.718,14.978 ; v2@58.507,15.635 C40.1@58.507,17.09
  Signal Layer 2 w0.5: v2@49.301,35.204 49.886,34.62 49.886,28.931 58.496,20.32 v2(58.496,15.596)
  other v1: 46.023,24.821 46.823,24.821 47.623,24.821 48.423,24.821 49.223,24.821 50.023,24.821 50.823,24.821 51.623,24.821 52.423,24.821 53.223,24.821 46.423,25.621 47.223,25.621 48.023,25.621 48.823,25.621 49.623,25.621 50.423,25.621 51.223,25.621 52.023,25.621 59.223,25.621 46.023,26.421 46.823,26.421 47.623,26.421 48.423,26.421 49.223,26.421 50.023,26.421 50.823,26.421 51.623,26.421 54.823,26.421 55.623,26.421 58.823,26.421 49.623,27.221 50.423,27.221 54.423,27.221 55.223,27.221 56.023,27.221 59.223,27.221 50.023,28.021 53.223,28.021 54.023,28.021 54.823,28.021 55.623,28.021 58.823,28.021 49.623,28.821 52.823,28.821 53.623,28.821 54.423,28.821 55.223,28.821 56.023,28.821 56.823,28.821 57.623,28.821 58.423,28.821 59.223,28.821 52.423,29.621 53.223,29.621 54.023,29.621 54.823,29.621 55.623,29.621 56.423,29.621 57.223,29.621 58.023,29.621 58.823,29.621 49.623,30.421 52.023,30.421 52.823,30.421 53.623,30.421 54.423,30.421 55.223,30.421 56.023,30.421 56.823,30.421 57.623,30.421 58.423,30.421 59.223,30.421 46.023,31.221 46.823,31.221 47.623,31.221 48.423,31.221 49.223,31.221 52.423,31.221 53.223,31.221 54.023,31.221 54.823,31.221 55.623,31.221 56.423,31.221 57.223,31.221 58.023,31.221 58.823,31.221 48.823,32.021 49.623,32.021 52.023,32.021 52.823,32.021 53.623,32.021 54.423,32.021 55.223,32.021 56.023,32.021 56.823,32.021 57.623,32.021 58.423,32.021 59.223,32.021 49.223,32.821 52.423,32.821 53.223,32.821 58.023,32.821 58.823,32.821 52.023,33.621 52.823,33.621 53.623,33.621 58.423,33.621 59.223,33.621 52.423,34.421 53.223,34.421 58.023,34.421 58.823,34.421 52.023,35.221 52.823,35.221 53.623,35.221 58.423,35.221 59.223,35.221 52.423,36.021 53.223,36.021 58.023,36.021 58.823,36.021 52.023,36.821 52.823,36.821 53.623,36.821 58.423,36.821 59.223,36.821 52.423,37.621 53.223,37.621 58.023,37.621 58.823,37.621 52.023,38.421 52.823,38.421 53.623,38.421 58.423,38.421 59.223,38.421 49.223,39.221 50.023,39.221 50.823,39.221 51.623,39.221 52.423,39.221 53.223,39.221 54.023,39.221 54.823,39.221 55.623,39.221 56.423,39.221 57.223,39.221 58.023,39.221 58.823,39.221 48.823,40.021 49.623,40.021 50.423,40.021 51.223,40.021 52.023,40.021 52.823,40.021 53.623,40.021 54.423,40.021 55.223,40.021 56.023,40.021 56.823,40.021 57.623,40.021 58.423,40.021 59.223,40.021 49.223,40.821 50.023,40.821 50.823,40.821 51.623,40.821 52.423,40.821 53.223,40.821 54.023,40.821 54.823,40.821 55.623,40.821 56.423,40.821 57.223,40.821 58.023,40.821 58.823,40.821 48.823,41.621 49.623,41.621 50.423,41.621 51.223,41.621 52.023,41.621 52.823,41.621 53.623,41.621 54.423,41.621 55.223,41.621 56.023,41.621 56.823,41.621 57.623,41.621 58.423,41.621 59.223,41.621
  other v2: 49.367,35.247
  other v3: 48.324,27.426 46.393,27.476 47.384,27.476 47.333,28.289 48.298,28.289 46.419,28.315 47.305,29.133 48.247,29.127 46.393,29.153 48.171,29.94 47.282,29.966 46.393,29.991 56.782,33.572 55.944,33.598 54.978,33.649 56.756,34.715 55.055,34.741 55.944,34.741 55.854,35.84 56.756,35.858 55.055,35.884 55.905,37.033 56.782,37.027 55.055,37.052
SW2: C41.2 L2.2 Q4.1 Q4.2 Q4.3 Q6.5-6-7-8 R42.2 U7.18 | length 19
  Top Layer w0.152: v2(66.421,15.646) 66.421,15.686 66.47,15.735 66.47,16.881 C41.2@66.774,17.186
  Top Layer w0.254: U7.18@65.041,14.33 66.349,15.638 66.412,15.638 v2(66.421,15.646)
  Signal Layer 2 w0.5: v2(66.421,15.646) 66.421,22.073 72.442,28.094 ; v1@69.56,35.069 70.035,35.069
  other v1: 65.223,24.821 66.023,24.821 70.023,24.821 70.823,24.821 71.623,24.821 72.423,24.821 73.223,24.821 74.023,24.821 74.823,24.821 75.623,24.821 76.423,24.821 77.223,24.821 61.623,25.621 64.823,25.621 65.623,25.621 66.423,25.621 67.223,25.621 70.423,25.621 71.223,25.621 72.023,25.621 72.823,25.621 73.623,25.621 74.423,25.621 75.223,25.621 77.623,25.621 65.223,26.421 66.023,26.421 66.823,26.421 67.623,26.421 71.623,26.421 72.423,26.421 73.223,26.421 74.023,26.421 61.623,27.221 64.823,27.221 65.623,27.221 66.423,27.221 67.223,27.221 68.023,27.221 68.823,27.221 72.023,27.221 72.823,27.221 73.623,27.221 62.023,28.021 64.423,28.021 65.223,28.021 66.023,28.021 66.823,28.021 67.623,28.021 68.423,28.021 69.223,28.021 73.223,28.021 74.023,28.021 61.623,28.821 62.423,28.821 63.223,28.821 64.023,28.821 64.823,28.821 65.623,28.821 66.423,28.821 67.223,28.821 68.023,28.821 68.823,28.821 69.623,28.821 70.423,28.821 73.623,28.821 74.423,28.821 62.023,29.621 62.823,29.621 63.623,29.621 64.423,29.621 65.223,29.621 66.023,29.621 66.823,29.621 67.623,29.621 68.423,29.621 69.223,29.621 70.023,29.621 70.823,29.621 74.823,29.621 77.223,29.621 61.623,30.421 62.423,30.421 63.223,30.421 64.023,30.421 64.823,30.421 65.623,30.421 66.423,30.421 67.223,30.421 68.023,30.421 68.823,30.421 69.623,30.421 70.423,30.421 71.223,30.421 72.023,30.421 76.023,30.421 76.823,30.421 77.623,30.421 62.023,31.221 62.823,31.221 63.623,31.221 64.423,31.221 65.223,31.221 66.023,31.221 66.823,31.221 67.623,31.221 68.423,31.221 69.223,31.221 70.023,31.221 70.823,31.221 71.623,31.221 72.423,31.221 76.423,31.221 77.223,31.221 61.623,32.021 62.423,32.021 63.223,32.021 64.023,32.021 64.823,32.021 65.623,32.021 66.423,32.021 67.223,32.021 68.023,32.021 68.823,32.021 69.623,32.021 70.423,32.021 71.223,32.021 72.023,32.021 72.823,32.021 62.023,32.821 62.823,32.821 63.623,32.821 64.423,32.821 69.223,32.821 70.023,32.821 70.823,32.821 71.623,32.821 72.423,32.821 73.223,32.821 61.623,33.621 62.423,33.621 63.223,33.621 64.023,33.621 64.823,33.621 69.623,33.621 70.423,33.621 71.223,33.621 72.023,33.621 72.823,33.621 62.023,34.421 62.823,34.421 63.623,34.421 64.423,34.421 70.023,34.421 70.823,34.421 71.623,34.421 72.423,34.421 61.623,35.221 62.423,35.221 63.223,35.221 64.023,35.221 64.823,35.221 69.623,35.221 70.423,35.221 71.223,35.221 72.023,35.221 72.823,35.221 62.023,36.021 62.823,36.021 63.623,36.021 64.423,36.021 70.023,36.021 70.823,36.021 71.623,36.021 72.423,36.021 61.623,36.821 62.423,36.821 63.223,36.821 64.023,36.821 64.823,36.821 69.623,36.821 70.423,36.821 71.223,36.821 72.023,36.821 72.823,36.821 62.023,37.621 62.823,37.621 63.623,37.621 64.423,37.621 70.023,37.621 70.823,37.621 71.623,37.621 72.423,37.621 61.623,38.421 62.423,38.421 63.223,38.421 64.023,38.421 64.823,38.421 69.623,38.421 70.423,38.421 71.223,38.421 72.023,38.421 72.823,38.421 62.023,39.221 62.823,39.221 63.623,39.221 64.423,39.221 65.223,39.221 66.023,39.221 66.823,39.221 67.623,39.221 68.423,39.221 69.223,39.221 70.023,39.221 70.823,39.221 71.623,39.221 72.423,39.221 73.223,39.221 74.023,39.221 61.623,40.021 62.423,40.021 63.223,40.021 64.023,40.021 64.823,40.021 65.623,40.021 66.423,40.021 67.223,40.021 68.023,40.021 68.823,40.021 69.623,40.021 70.423,40.021 71.223,40.021 72.023,40.021 72.823,40.021 73.623,40.021 74.423,40.021 62.023,40.821 62.823,40.821 63.623,40.821 64.423,40.821 65.223,40.821 66.023,40.821 66.823,40.821 67.623,40.821 68.423,40.821 69.223,40.821 70.023,40.821 70.823,40.821 71.623,40.821 72.423,40.821 73.223,40.821 74.023,40.821 61.623,41.621 62.423,41.621 63.223,41.621 64.023,41.621 64.823,41.621 65.623,41.621 66.423,41.621 67.223,41.621 68.023,41.621 68.823,41.621 69.623,41.621 70.423,41.621 71.223,41.621 72.023,41.621 72.823,41.621 73.623,41.621 74.423,41.621
  other v3: 77.309,26.648 75.231,26.673 76.251,26.695 77.259,27.554 76.251,27.61 75.209,27.661 77.241,28.448 75.286,28.473 76.2,28.499 68.038,34.928 65.96,34.953 66.98,34.976 67.988,35.834 66.98,35.89 65.938,35.941 67.97,36.728 66.015,36.754 66.929,36.779
TS: R38.1 R39.2 R40.2 U7.8 | length 10.8
  Top Layer w0.152: R40.2@60.8,8.407 60.8,8.382 R40.2@60.775,8.357 ; R40.2@60.833,8.357 R40.2@60.775,8.357 ; R40.2@60.833,8.433 62.168,8.433 R39.2@62.223,8.377 62.622,8.776 62.622,8.852 63.221,9.45 U7.8@63.221,9.982 ; R38.1@64.11,5.334 63.856,5.588 60.427,5.588 59.842,6.172 59.842,7.449 60.376,7.983 60.401,7.983 R40.2@60.775,8.357
VBUS: C2.1 C80.2 J2.6 L1.1 Q1.5 Q1.6 Q1.7 Q1.8 Q1.9 R56.1 U2.20 | length 54.7
  Top Layer w0.152: v6(14.752,19.384) Q1.9@14.784,19.384 ; J2.6@23.247,25.857 J2.6@23.571,25.857 ; J2.6@23.531,26.141 26.051,26.141 C2.1@26.344,26.434
  Top Layer w0.2: L1.1@11.412,15.429 11.386,15.455 11.386,20.291 C80.2@11.506,20.411 ; 12.446,16.993 13.81,15.628 U2.20@13.81,15.384 ; Q1.9@13.849,18.409 14.007,18.567 14.097,18.567 Q1.9@14.097,18.677 ; Q1.9@14.042,18.622 Q1.9@14.097,18.677 ; Q1.9@14.804,19.384 Q1.9@14.097,18.677
  Signal Layer 2 w0.152: J2.6@23.531,26.141 25.796,23.876 37.77,23.876 39.243,22.403 39.243,14.376 39.446,14.173 54.661,14.173 v2(55.982,12.852)
  other v4: 13.847,19.384
  other v6: 14.299,18.409 15.204,18.409 15.657,19.384 14.299,20.359 15.204,20.359
VBUS_C: C3.2 C4.1 C5.1 J1.A4 J1.A9 J1.B4 J1.B9 L1.2 | length 21
  Top Layer w0.152: J1.B9@4.065,5.161 4.224,5.161 4.595,5.532 5.115,5.532 5.246,5.664 J1.A4@5.385,5.664 ; J1.B4@5.389,3.041 5.549,3.041 5.92,3.412 6.439,3.412 6.634,3.607 J1.A9@6.756,3.607
  Top Layer w0.2: J1.B9@4.065,5.161 3.98,5.161 3.503,4.683 3.234,4.683 2.845,4.294 2.845,2.87 3.581,2.134 4.414,2.134 5.277,2.997 J1.B4@5.283,2.997 ; J1.A4@5.766,5.944 5.801,5.944 6.147,6.289 6.147,8.745 9.912,12.51 L1.2@9.912,15.429 ; C5.1@9.234,20.625 C5.1@9.534,20.325 ; C3.2@9.612,21.983 C3.2@9.612,22.059
  other v2: 9.296,17.526
VBUS_LV: C1.1 C15.1 Q1.1 Q1.2 Q1.3 U1.26 U1.27 U2.19 | length 12.1
  Top Layer w0.152: Q1.3@16.999,19.709 18.704,19.709 19.537,18.877 C15.1@19.587,18.877 19.632,18.832 U1.27@21.372,18.832 ; U1.26@21.51,19.232 21.51,18.876 U1.27@21.514,18.872
  Top Layer w0.2: U2.19@14.21,15.384 14.21,16.436 14.178,16.468 14.178,16.573 14.22,16.614 C1.1@14.283,16.678 14.258,16.703 14.156,16.703 14.156,17.255 14.326,17.424 16.612,17.424 16.999,17.812 Q1.1@16.999,18.409 Q1.2@16.999,19.059 Q1.3@16.999,19.709
VIN_3V3: C18.1 C65.2 C66.2 R26.1 R111.2 U1.32 U8.1 | length 40.8
  Top Layer w0.152: v2(20.371,15.469) 20.38,15.469 20.46,15.549 20.46,15.888 21.311,16.739 21.311,16.808 21.344,16.84 U1.32@21.412,16.84
  Top Layer w0.2: U1.32@21.412,16.832 U1.32@21.51,16.832
  Top Layer w0.254: C65.2@11.989,-0.445 11.989,-0.431 12.268,-0.151 12.566,-0.151 12.57,-0.147 C66.2@14.04,-0.147 ; C66.2@14.021,-0.263 15.031,-0.263 15.18,-0.114 15.18,-0.073 15.371,0.119 15.74,0.119 U8.1@15.824,0.203 ; v2(33.426,0.61) 33.541,0.495 33.541,0.134 R111.2@33.655,0.019
  Bottom Layer w0.254: v2(16.231,0.423) 16.231,2.667 v2(19.609,6.045) 19.863,6.299 19.863,14.961 v2@20.362,15.46 ; v2@16.256,0.457 16.376,0.577 27.114,0.577 27.146,0.61 v2(33.426,0.61)